# Altium PCB AthetiTech_PCB_V1.0.PcbDoc (part 2 of 3)
Units mm, origin at the board's own origin, x right, y up, seen from the top; angles counter-clockwise.
Board outline 50 x 35 mm, 2 copper layers (Top Layer, Bottom Layer); 161 components, 122 nets, 602 pads, 2 vias.
Unrouted connection lines stored in the file: 390.
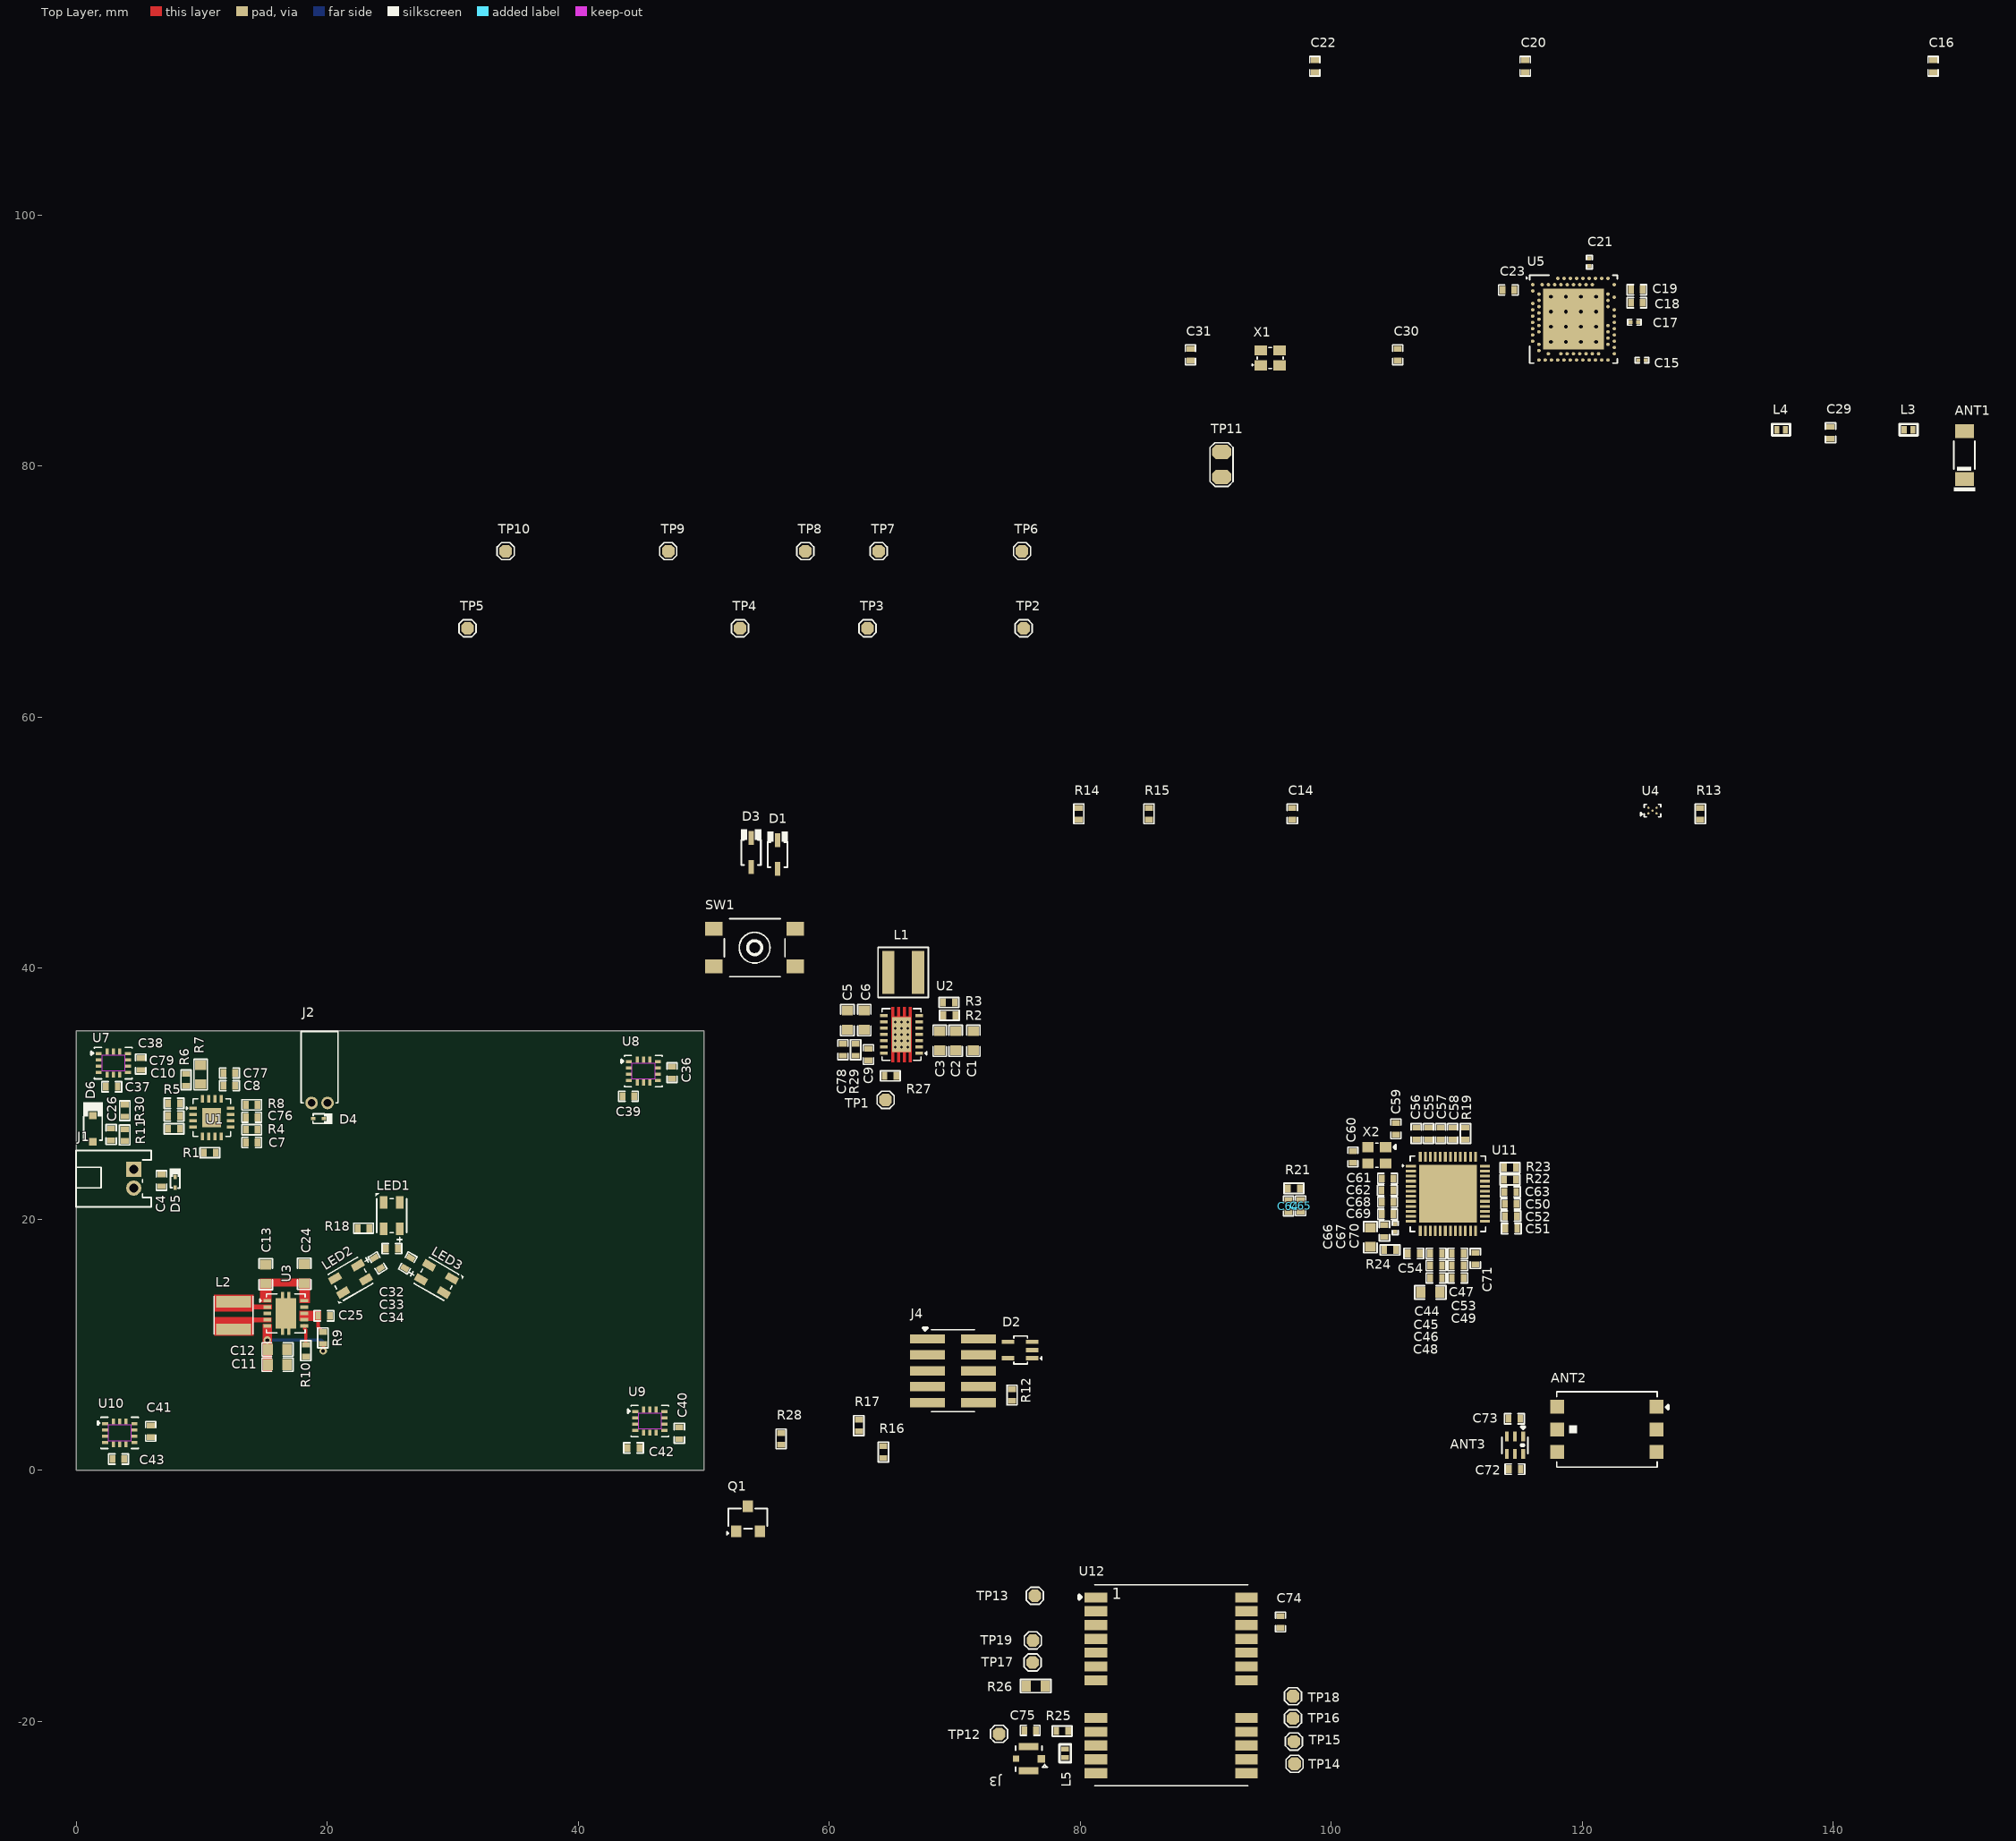
[diagram p0: Top Layer view]

## Part data (continued)
C54: library part GCM155R71H103JA55D, "CAP CER 10000PF 50V X7R 0402", Case Code (Imperial)=0402, Case Code (Metric)=1005, LCSC Part Number=C5189696, Manufacturer=Murata, Max Operating Temperature=125°C, Min Operating Temperature=-55°C, Ratings=AEC-Q200, Supplier Part Number=490-14352-2-ND, Tolerance=5%, Voltage Rating=50V, Case/Package=0402, Category="Ceramic Capacitors", ComponentLink1Description=http://search.murata.co.jp/Ceramy/image/img/A01X/partnumbering_e_02.pdf?src-supplier=Digikey, ComponentLink1URL=http://search.murata.co.jp/Ceramy/image/img/A01X/partnumbering_e_02.pdf?src-supplier=Digikey, ComponentLink2Description=http://search.murata.co.jp/Ceramy/image/img/A01X/G101/ENG/GCM155R71H103JA55-01.pdf?src-supplier=Digikey, ComponentLink2URL=http://search.murata.co.jp/Ceramy/image/img/A01X/G101/ENG/GCM155R71H103JA55-01.pdf?src-supplier=Digikey, Item Type=Capacitor, Manufacturer Part Number=GCM155R71H103JA55D, Mounting Technology="Surface Mount", Packaging="Cut Tape", RoHS=Yes, RoHS Compliant=Yes, Series=GCM, Supplier=Digikey
C64: library part 0402N270J250CT, "CAP CER 27PF 25V C0G/NP0 0402", LCSC Part Number=C424826, Manufacturer="Walsin Technologies", Supplier Part Number 1=1292-1291-1-ND, ComponentLink1Description=LCSC, ComponentLink1URL=https://lcsc.com/product-detail/Multilayer-Ceramic-Capacitors-MLCC-SMD-SMT_Walsin-Tech-Corp-0402N270J250CT_C424826.html, Item Type=Capacitor, Manufacturer Part Number=0402N270J250CT, Pricing 1="1=0.1, 10=0.017, 50=0.0094, 100=0.0076, 500=0.00544, 1000=0.00427, 2500=0.00388, 5000=0.00357 (USD)", RoHS Compliant=Yes, Stock 1=71180, Supplier 1=Digi-Key
C66: library part CC0603JRNPO9BN821, "CAP CER 820PF 50V C0G/NPO 0603", Case Code (Imperial)=0603, Case Code (Metric)=1608, Dielectric=C0G, LCSC Part Number=C107057, Manufacturer=Yageo, Max Operating Temperature=125°C, Min Operating Temperature=-55°C, Tolerance=5%, Voltage Rating=50V, Case/Package=0603, ComponentLink1Description=https://datasheet.ciiva.com/26829/getdatasheetpartid-403541-26829388.pdf?src-supplier=Verical, ComponentLink1URL=https://datasheet.ciiva.com/26829/getdatasheetpartid-403541-26829388.pdf?src-supplier=Verical, Depth=0.8mm, Height=0.8mm, Item Type=Capacitors, Lead Free="Lead Free", Length=1.6mm, Manufacturer Part Number=CC0603JRNPO9BN821, Mounting Technology="Surface Mount", Packaging="Tape and Reel", Pins=2, Pricing="4000=0.0129, 24000=0.0087, 48000=0.0086 (USD)", Radiation Hardening=No, RoHS=Yes, RoHS Compliant=Yes, Series=CC, Stock=772000, Supplier="Arrow Electronics", Termination=SMD/SMT, Thickness=0.035inch, Voltage Rating (DC)=50V, Width=0.031inch
C70: library part GJM0335C1E180GB01D, "CAP CER 18PF 25V C0G/NP0 0201", LCSC Part Number=C913481, Manufacturer="Murata Electronics", Package=0201, Supplier Part Number=1853317, Category="Ceramic Capacitors", ComponentLink1Description=LCSC, ComponentLink2Description=http://www.mouser.com/ds/2/281/c02e-2905.pdf?src-supplier=Mouser, ComponentLink2URL=http://www.mouser.com/ds/2/281/c02e-2905.pdf?src-supplier=Mouser, ComponentLink3Description=https://datasheet.octopart.com/GJM0335C1E180GB01D-Murata-datasheet-22122223.pdf?src-supplier=Future+Electronics, ComponentLink3URL=https://datasheet.octopart.com/GJM0335C1E180GB01D-Murata-datasheet-22122223.pdf?src-supplier=Future+Electronics, ComponentLink4Description=https://search.murata.co.jp/Ceramy/image/img/A01X/G101/ENG/GJM0335C1E180GB01-01.pdf?src-supplier=Digi-Key, ComponentLink4URL=https://search.murata.co.jp/Ceramy/image/img/A01X/G101/ENG/GJM0335C1E180GB01-01.pdf?src-supplier=Digi-Key, ComponentLink5Description=http://search.murata.co.jp/Ceramy/image/img/A01X/G101/ENG/GJM0335C1E180GB01-01.pdf?src-supplier=Digi-Key, ComponentLink5URL=http://search.murata.co.jp/Ceramy/image/img/A01X/G101/ENG/GJM0335C1E180GB01-01.pdf?src-supplier=Digi-Key, ComponentLink6Description=https://datasheet.octopart.com/GJM0335C1E180GB01D-Murata-datasheet-12511495.pdf?src-supplier=TME, ComponentLink6URL=https://datasheet.octopart.com/GJM0335C1E180GB01D-Murata-datasheet-12511495.pdf?src-supplier=TME, Item Type=Capacitor, Manufacturer Part Number=GJM0335C1E180GB01D, Pricing="1000=0.018, 5000=0.015, 10000=0.012 (GBP)", RoHS=Yes, Stock=15000, Supplier=Rs
D1 D3: "Diode Schottky Barrier 25V 0.3A 2 SOD-323", Average Rectified Current=300mA, Case/Package=SOD, LCSC Part Number=C146358, Manufacturer=Toshiba, Max Operating Temperature=100°C, Max Repetitive Reverse Voltage (Vrrm)=25V, Max Reverse Voltage (DC)=20V, Min Operating Temperature=-40°C, Category="Rectifier Diodes", ComponentLink1Description=https://datasheet.ciiva.com/45259/dst-1ss404-tde-en-1850-45259189.pdf?src-supplier=Digikey, ComponentLink1URL=https://datasheet.ciiva.com/45259/dst-1ss404-tde-en-1850-45259189.pdf?src-supplier=Digikey, ComponentLink2Description=https://datasheet.ciiva.com/45259/dst-1ss404-tde-en-1850-45259190.pdf?src-supplier=Digikey, ComponentLink2URL=https://datasheet.ciiva.com/45259/dst-1ss404-tde-en-1850-45259190.pdf?src-supplier=Digikey, ComponentLink3Description=https://datasheet.ciiva.com/45259/dst-1ss404-tde-en-1850-45259191.pdf?src-supplier=Digikey, ComponentLink3URL=https://datasheet.ciiva.com/45259/dst-1ss404-tde-en-1850-45259191.pdf?src-supplier=Digikey, Contact Plating=Tin,Silver, Forward Current=300mA, Item Type=Diode, Manufacturer Part Number=1SS404,H3F, Mount="Surface Mount", Packaging="Cut Tape", Pricing 1="3000=0.01778, 6000=0.01748, 12000=0.01718, 18000=0.01688, 24000=0.01658 (USD)", RoHS=No, Series=-, Stock 1=36000, Supplier 1=Avnet, Supplier Part Number 1=1SS404,H3F
D2: "TVS DIODE 3VWM SOT323-5", LCSC Part Number=C703691, Manufacturer=STMicroelectronics, ComponentLink1Description=https://datasheet.ciiva.com/23847/cd00002946-23847220.pdf?src-supplier=Newark, ComponentLink1URL=https://datasheet.ciiva.com/23847/cd00002946-23847220.pdf?src-supplier=Newark, ComponentLink2Description=https://datasheet.ciiva.com/4509/cd00002946-81943-4509940.pdf?src-supplier=Mouser, ComponentLink2URL=https://datasheet.ciiva.com/4509/cd00002946-81943-4509940.pdf?src-supplier=Mouser, ComponentLink3Description=https://datasheet.ciiva.com/5782/cd00002946-5782886.pdf?src-supplier=Farnell, ComponentLink3URL=https://datasheet.ciiva.com/5782/cd00002946-5782886.pdf?src-supplier=Farnell, ComponentLink4Description=https://datasheet.ciiva.com/338/cd00002946-338376.pdf?src-supplier=Digikey, ComponentLink4URL=https://datasheet.ciiva.com/338/cd00002946-338376.pdf?src-supplier=Digikey, ComponentLink5Description=https://datasheet.ciiva.com/338/cd00002946-338377.pdf?src-supplier=Digikey, ComponentLink5URL=https://datasheet.ciiva.com/338/cd00002946-338377.pdf?src-supplier=Digikey, ComponentLink6Description=https://datasheet.ciiva.com/338/cd00002946-338378.pdf?src-supplier=Digikey, ComponentLink6URL=https://datasheet.ciiva.com/338/cd00002946-338378.pdf?src-supplier=Digikey, Item Type="TVS Diodes", Manufacturer Part Number=ESDALC6V1W5, Pricing="3000=0.0569, 9000=0.0547, 12000=0.0774, 15000=0.0538, 30000=0.0749, 45000=0.0518, 75000=0.05 (USD)", RoHS=Yes, Stock=3000, Supplier="Future Electronics"
D4 D5: "TVS DIODE 5V 9.8V SOD923", Breakdown Voltage=5.4V, Capacitance=0.9pF, Case/Package=SOD-923-2, Clamping Voltage=9.8V, LCSC Part Number=C82326, Leakage Current=1uA, Manufacturer="ON Semiconductor", Max Operating Temperature=150°C, Max Surge Current=1A, Min Operating Temperature=-55°C, Operating Supply Voltage=5V, Package Quantity=1, Peak Pulse Power=150mW, Power Line Protection=No, Resistor Type=Zener, Reverse Breakdown Voltage=5.8V, Supplier Part Number 1=ESD9L5.0ST5GOSCT-ND, Test Current=1mA, Category="ESD and Circuit Protection ICs", Clamping Voltage-Max=9.8V, ComponentLink1Description=https://datasheet.ciiva.com/15143/getdatasheetpartid-185186-15143896.pdf?src-supplier=Verical, ComponentLink1URL=https://datasheet.ciiva.com/15143/getdatasheetpartid-185186-15143896.pdf?src-supplier=Verical, ComponentLink2Description=https://datasheet.ciiva.com/4510/esd9l-d-4510647.pdf?src-supplier=Mouser, ComponentLink2URL=https://datasheet.ciiva.com/4510/esd9l-d-4510647.pdf?src-supplier=Mouser, ComponentLink3Description=https://datasheet.ciiva.com/3304/esd9l-d-3304011.pdf?src-supplier=Avnet, ComponentLink3URL=https://datasheet.ciiva.com/3304/esd9l-d-3304011.pdf?src-supplier=Avnet, ComponentLink4Description=https://datasheet.ciiva.com/16437/esd9l-d-16437835.pdf?src-supplier=Future+Electronics, ComponentLink4URL=https://datasheet.ciiva.com/16437/esd9l-d-16437835.pdf?src-supplier=Future+Electronics, ComponentLink5Description=https://datasheet.ciiva.com/339/esd9l-d-339853.pdf?src-supplier=Digi-Key, ComponentLink5URL=https://datasheet.ciiva.com/339/esd9l-d-339853.pdf?src-supplier=Digi-Key, ComponentLink6Description=https://datasheet.ciiva.com/339/esd9l-d-339854.pdf?src-supplier=Digi-Key, ComponentLink6URL=https://datasheet.ciiva.com/339/esd9l-d-339854.pdf?src-supplier=Digi-Key, ComponentLink7Description=https://datasheet.ciiva.com/11195/esd9l-d-11195342.pdf?src-supplier=Avnet, ComponentLink7URL=https://datasheet.ciiva.com/11195/esd9l-d-11195342.pdf?src-supplier=Avnet, ComponentLink8Description=https://datasheet.ciiva.com/25958/esd9l-d-25958446.pdf?src-supplier=Avnet+Europe, ComponentLink8URL=https://datasheet.ciiva.com/25958/esd9l-d-25958446.pdf?src-supplier=Avnet+Europe, ComponentLink9Description=https://datasheet.ciiva.com/339/esd9l-d-339855.pdf?src-supplier=Digi-Key, ComponentLink9URL=https://datasheet.ciiva.com/339/esd9l-d-339855.pdf?src-supplier=Digi-Key, Contact Plating=Tin,Matte, Depth=0.6mm, Diode Type=ZENER, Direction=Unidirectional, Element Configuration=Single, ESD Protection=Yes, Halogen Free="Halogen Free", Height=0.4mm, Lead Free="Lead Free", Length=0.8mm, Manufacturer Part Number=ESD9L5.0ST5G, Max Breakdown Voltage=5.4V, Max Reverse Leakage Current=1uA, Min Breakdown Voltage=5.4V, Number of Channels=1, Number of Elements=1, Number of Lines=1, Number of Pins=2, Number of Unidirectional Channels=1, Packaging="Tape and Reel", Peak Pulse Current=1A, Polarity=Unidirectional, Power Dissipation=150mW, Pricing 1="1=0.37000, 10=0.25600, 100=0.12500, 500=0.10426, 1000=0.07244, 2000=0.06278 (USD)", Radiation Hardening=No, REACH SVHC="No SVHC", Reverse Standoff Voltage=5V, RoHS=Yes, RoHS Compliant=Yes, Series="Automotive, AEC-Q101", Stock 1=558996, Supplier 1=Digi-Key, Termination=SMD/SMT, Width=0.65mm, Working Voltage=5V
D6: "DIODE ZENER 3.3V 200MW SOD323F", Forward Voltage=1V, LCSC Part Number=C2978865, Manufacturer="ON Semiconductor / Fairchild", Max Operating Temperature=150°C, Max Power Dissipation=200mW, Max Reverse Leakage Current=4.5uA, Min Operating Temperature=-65°C, Package Quantity=1, Supplier Part Number 1=MM3Z3V3BCT-ND, Test Current=5mA, Tolerance=2%, Working Voltage=3.3V, ComponentLink1Description=http://www.onsemi.com/pub/Collateral/MM3Z9V1B-D.pdf?src-supplier=Digi-Key, ComponentLink1URL=http://www.onsemi.com/pub/Collateral/MM3Z9V1B-D.pdf?src-supplier=Digi-Key, ComponentLink2Description=http://www.mouser.com/ds/2/149/MM3Z3V3B-187166.pdf?src-supplier=Mouser, ComponentLink2URL=http://www.mouser.com/ds/2/149/MM3Z3V3B-187166.pdf?src-supplier=Mouser, ComponentLink3Description=https://www.fairchildsemi.com/datasheets/MM/MM3Z9V1B.pdf?src-supplier=Avnet, ComponentLink3URL=https://www.fairchildsemi.com/datasheets/MM/MM3Z9V1B.pdf?src-supplier=Avnet, ComponentLink4Description=http://www.farnell.com/datasheets/1706525.pdf?src-supplier=Element14, ComponentLink4URL=http://www.farnell.com/datasheets/1706525.pdf?src-supplier=Element14, Element Configuration=Single, Height=1mm, Impedance=89R, Item Type=Diode, Lead Free="Lead Free", Length=1.3mm, Manufacturer Part Number=MM3Z3V3B, Mount="Surface Mount", Number of Pins=2, Packaging="Tape and Reel", Peak Reverse Current=4.5uA, Power Dissipation=200mW, Pricing 1="1=0.22, 10=0.18, 100=0.0956, 500=0.06288, 1000=0.04276 (USD)", Radiation Hardening=No, REACH SVHC="No SVHC", Stock 1=473644, Supplier 1=Digi-Key, Voltage Tolerance=2%, Weight=0.0276g, Width=1.7mm, Zener Voltage=3.3V
J1: "CONN HEADER R/A 2POS 1.5MM", LCSC Part Number=C160729, Manufacturer=JST, Item Type=Connectors, Manufacturer Part Number=S2B-ZR-3.4(LF)(SN), Pricing="2000=0.0671, 4000=0.0659, 8000=0.0648, 10000=0.0645, 30000=0.0623 (USD)", RoHS=Yes, Supplier="Future Electronics"
J2: "2 Position Spring Piston Connector Through Hole, Right Angle", Manufacturer=Mill-Max, Supplier Part Number=54-854-22-002-20-041101-ND, Item Type="Spring Loaded", Manufacturer Part Number=854-22-002-20-041101, Pricing="1=3.53, 10=3.002, 25=2.8136, 50=2.679, 100=2.551, 250=2.39124, 500=2.27716, 1000=2.16851, 2500=2.03287 (USD)", RoHS=No, Supplier=Digikey
J3: "CONN MHF4 JACK STR SMD", Manufacturer="TE Connectivity", Supplier Part Number=712-CONMHF4-SMD-G-T, Item Type=Connectors, Manufacturer Part Number=CONMHF4-SMD-G-T, Number of Positions=1, Pricing="1=0.35, 10=0.35, 50=0.35, 100=0.345, 1000=0.26, 10000=0.26 (USD)", RoHS=No, Stock=14009, Supplier=Mouser
J4: "CONN HEADER SMD 10POS 1.27MM SWD Connector", LCSC Part Number=C448647, Manufacturer=Samtec, ComponentLink1Description=https://datasheet.ciiva.com/23735/81359-23735917.pdf?src-supplier=Newark, ComponentLink1URL=https://datasheet.ciiva.com/23735/81359-23735917.pdf?src-supplier=Newark, ComponentLink2Description=https://datasheet.ciiva.com/10245/ftsh-mt-10245289.pdf?src-supplier=Avnet, ComponentLink2URL=https://datasheet.ciiva.com/10245/ftsh-mt-10245289.pdf?src-supplier=Avnet, ComponentLink3Description=https://datasheet.ciiva.com/739/ftsh-1xx-xx-xxx-dv-xxx-mkt-739005.pdf?src-supplier=Digikey, ComponentLink3URL=https://datasheet.ciiva.com/739/ftsh-1xx-xx-xxx-dv-xxx-mkt-739005.pdf?src-supplier=Digikey, Item Type=Header, Manufacturer Part Number=FTSH-105-01-L-DV-K-TR, Pricing="1=2.58, 100=2.03, 250=1.83 (USD)", RoHS=Yes, Stock=9031, Supplier=Digikey
L1: library part XFL4020-152MEC, "FIXED IND 1.5UH 9.1A 15.8MOHM SM", LCSC Part Number=C3033018, Manufacturer=Coilcraft, ComponentLink1Description=https://datasheet.ciiva.com/13168/xfl4020-13168080.pdf?src-supplier=Mouser, ComponentLink1URL=https://datasheet.ciiva.com/13168/xfl4020-13168080.pdf?src-supplier=Mouser, ComponentLink2Description=https://datasheet.ciiva.com/22679/1682010-22679275.pdf?src-supplier=Element14, ComponentLink2URL=https://datasheet.ciiva.com/22679/1682010-22679275.pdf?src-supplier=Element14, ComponentLink3Description=https://datasheet.ciiva.com/22679/1682010-22679276.pdf?src-supplier=Element14, ComponentLink3URL=https://datasheet.ciiva.com/22679/1682010-22679276.pdf?src-supplier=Element14, ESR=15.8mR, Item Type=Inductors, Manufacturer Part Number=XFL4020-152MEC, Pricing="1=3.04, 10=2.59, 50=2.39, 100=1.78, 1000=1.23, 10000=1.23 (USD)", RoHS=Yes, Stock=9871, Supplier=Mouser
L2: library part LQH3NPN2R2MJRL, "FIXED IND 2.2UH 980MA 81.6 MOHM", Case Code (Imperial)=1212, Case Code (Metric)=3030, Current Rating=980mA, DC Resistance (DCR)=81.6mR, LCSC Part Number=C341775, Manufacturer=Murata, Max Operating Temperature=105°C, Min Operating Temperature=-40°C, Resistor Type=Wirewound, Saturation Current=1.8A, Self Resonant Frequency=45MHz, Test Frequency=1MHz, Tolerance=20%, Case/Package=1212, Category="Fixed Inductors", ComponentLink1Description=http://www.murata.com/~/media/webrenewal/support/library/catalog/products/inductor/chip/o05e.ashx?src-supplier=Digi-Key, ComponentLink1URL=http://www.murata.com/~/media/webrenewal/support/library/catalog/products/inductor/chip/o05e.ashx?src-supplier=Digi-Key, ComponentLink2Description=http://search.murata.co.jp/Ceramy/image/img/P02/JELF243A-0114.pdf?src-supplier=Digi-Key, ComponentLink2URL=http://search.murata.co.jp/Ceramy/image/img/P02/JELF243A-0114.pdf?src-supplier=Digi-Key, Core Material=Ferrite, Height - Seated (Max)=0.047inch, Item Type=Inductor, Length=0.118inch, Manufacturer Part Number=LQH3NPN2R2MJRL, Mounting Technology="Surface Mount", Packaging="Tape and Reel", Pricing 1="1=0.41670, 10=0.27560, 25=0.27280, 100=0.23380, 250=0.22710, 500=0.21570, 1000=0.17630 (USD)", RoHS=Yes, RoHS Compliant=Yes, Shielding=Shielded, Stock 1=1497, Supplier 1="Arrow Electronics", Supplier Part Number 1=LQH3NPN2R2MJRL, Width=0.118inch
L3: library part LRC0402CS3N3GV001T, "Fixed Ind 3.3NH 300MA 190MOHM Sm", Manufacturer=Johanson, Supplier Part Number=712-LRC0402CS3N3GV001TCT-ND, Item Type=Inductors, Manufacturer Part Number=LRC0402CS3N3GV001T, Pricing="1=0.1, 10=0.03, 100=0.0247, 1000=0.02034, 5000=0.01774 (USD)", RoHS=Yes, RoHS Compliant=Yes, Stock=663707, Supplier=Digikey
L4: library part CS0402-2N7J-S, "640mA 2.7nH ±5% 120mΩ 0402 Inductors (SMD) ROHS", LCSC Part Number=C142181, Manufacturer="Chilisin Elec", Package=0402, ComponentLink1Description=LCSC, ComponentLink1URL=https://www.lcsc.com/product-detail/Inductors-SMD_Chilisin-Elec-CS0402-2N7J-S_C142181.html, Item Type=Inductors, Manufacturer Part Number=CS0402-2N7J-S
L5: library part LQG15HZ27NH02D, "FIXED IND 27NH 350MA 460MOHM SMD", Case Code (Imperial)=0402, Case Code (Metric)=1005, Current Rating=350mA, DC Resistance (DCR)=460mR, LCSC Part Number=C237452, Manufacturer=Murata, Max Operating Temperature=125°C, Min Operating Temperature=-55°C, Ratings=AEC-Q200, Self Resonant Frequency=1.7GHz, Supplier Part Number=81-LQG15HZ27NH02D, Test Frequency=100MHz, Tolerance=3%, Case/Package=0402, Category="Fixed Inductors", ComponentLink1Description=http://search.murata.co.jp/Ceramy/image/img/P02/JELF243B-9110.pdf?src-supplier=Digi-Key, ComponentLink1URL=http://search.murata.co.jp/Ceramy/image/img/P02/JELF243B-9110.pdf?src-supplier=Digi-Key, Core Material=Air, Item Type=Inductor, Manufacturer Part Number=LQG15HZ27NH02D, Mounting Technology="Surface Mount", Packaging="Cut Tape", Pricing="1=0.1, 10=0.068, 50=0.068, 100=0.047, 1000=0.03, 10000=0.026 (USD)", RoHS=Yes, RoHS Compliant=Yes, Series=LQG15, Shielding=Unshielded, Stock=436, Supplier=Mouser
LED1 LED2 LED3: "SMD,2.4x2.7mm RGB LEDs(Built-in IC) ROHS", LCSC Part Number=C4154872, Manufacturer=WORLDSEMI, Item Type=LED, Manufacturer Part Number=WS2812C-2427, RoHS=No, Supplier=LCSC
Q1: "N-CHANNEL 20-V (D-S) MOSFET", LCSC Part Number=C5310968, Manufacturer="TECH PUBLIC", Manufacturer Part Number=SI2302CDS, Package=SOT-23, ComponentLink1Description=LCSC, ComponentLink1URL=https://www.lcsc.com/product-detail/MOSFETs_TECH-PUBLIC-SI2302CDS_C5310968.html, Item Type=Mosfet
R1 R4 R19 R30: library part RC0402FR-07100KL, "RES 100K OHM 1% 1/16W 0402", Case Code (Imperial)=0402, Case Code (Metric)=1005, LCSC Part Number=C60491, Manufacturer=Yageo, Max Operating Temperature=155°C, Max Power Dissipation=63mW, Min Operating Temperature=-55°C, Package Quantity=1, Resistance=100kR, Resistance Tolerance=1%, Resistor Type="Thick Film", Supplier Part Number 1=603-RC0402FR-07100KL, Temperature Coefficient=100ppm/°C, Voltage Rating=50V, Case/Package=0402, Category="Chip SMD Resistors", ComponentLink1Description=https://datasheet.ciiva.com/11819/0900766b80c66297-11819452.pdf?src-supplier=RSComponents, ComponentLink1URL=https://datasheet.ciiva.com/11819/0900766b80c66297-11819452.pdf?src-supplier=RSComponents, ComponentLink2Description=https://datasheet.ciiva.com/22747/1018594-22747509.pdf?src-supplier=Element14, ComponentLink2URL=https://datasheet.ciiva.com/22747/1018594-22747509.pdf?src-supplier=Element14, ComponentLink3Description=https://datasheet.ciiva.com/2453/pyu-r-int-thick-7-2453362.pdf?src-supplier=Digi-Key, ComponentLink3URL=https://datasheet.ciiva.com/2453/pyu-r-int-thick-7-2453362.pdf?src-supplier=Digi-Key, ComponentLink4Description=https://datasheet.ciiva.com/2453/pyu-r-int-thick-7-2453363.pdf?src-supplier=Digi-Key, ComponentLink4URL=https://datasheet.ciiva.com/2453/pyu-r-int-thick-7-2453363.pdf?src-supplier=Digi-Key, ComponentLink5Description=https://datasheet.ciiva.com/2453/pyu-r-int-thick-7-2453361.pdf?src-supplier=Digi-Key, ComponentLink5URL=https://datasheet.ciiva.com/2453/pyu-r-int-thick-7-2453361.pdf?src-supplier=Digi-Key, ComponentLink6Description=https://datasheet.ciiva.com/12667/pyu-rc0402-51-rohs-l-6-r-12667930.pdf?src-supplier=Mouser, ComponentLink6URL=https://datasheet.ciiva.com/12667/pyu-rc0402-51-rohs-l-6-r-12667930.pdf?src-supplier=Mouser, ComponentLink7Description=https://datasheet.ciiva.com/15189/getdatasheetpartid-323696-15189334.pdf?src-supplier=Verical, ComponentLink7URL=https://datasheet.ciiva.com/15189/getdatasheetpartid-323696-15189334.pdf?src-supplier=Verical, Construction=Rectangular, Depth=0.5mm, Features="Moisture Resistant", Height=0.016inch, Item Type=Resistor, Lead Free="Lead Free", Length=0.039inch, Manufacturer Part Number=RC0402FR-07100KL, Military Standard=Not, Number of Terminations=2, Packaging="Tape and Reel", Power Rating=63mW, Pricing 1="1=0.10000, 10=0.01200, 50=0.01200, 100=0.00500, 1000=0.00300, 2500=0.00200, 10000=0.00100 (USD)", REACH SVHC="No SVHC", RoHS=Yes, RoHS Compliant=Yes, Series=RC, Stock 1=7759549, Supplier 1=Mouser, Technology="THICK FILM", Termination=SMD/SMT, Tolerance=1%, Width=0.02inch, Working Voltage=50V
R2 R27: library part AF0402JR-071ML, "RES SMD 1M OHM 5% 1/16W 0402", Case/Package=0402, LCSC Part Number=C144054, Manufacturer=Yageo, Max Operating Temperature=155°C, Max Power Dissipation=63mW, Min Operating Temperature=-55°C, Resistance=1MR, Resistor Type="Thick Film", Supplier Part Number 1=AF0402JR-071ML-ND, Temperature Coefficient=100ppm/°C, Tolerance=5%, ComponentLink1Description=https://www.yageo.com/upload/media/product/productsearch/datasheet/rchip/PYu-AF_51_RoHS_L_6.pdf?src-supplier=Digi-Key, ComponentLink1URL=https://www.yageo.com/upload/media/product/productsearch/datasheet/rchip/PYu-AF_51_RoHS_L_6.pdf?src-supplier=Digi-Key, Features="Moisture Resistant,Anti-Sulfur", Height=0.015inch, Item Type=Resistor, Length=0.039inch, Manufacturer Part Number=AF0402JR-071ML, Number of Terminations=2, Packaging="Tape and Reel", Pricing 1="10000=0.00408 (USD)", RoHS Compliant=Yes, Stock 1=0, Supplier 1=Digi-Key, Width=0.02inch
R3: library part RT0402BRD07180KL, "RES 180K OHM 0.1% 1/16W 0402", Case/Package=0402, LCSC Part Number=C852573, Manufacturer=Yageo, Max Operating Temperature=155°C, Max Power Dissipation=63mW, Min Operating Temperature=-55°C, Supplier Part Number=603-RT0402BRD07180KL, Temperature Coefficient=25ppm/°C, Tolerance=0.1%, Category="Chip SMD Resistors", ComponentLink1Description=http://www.yageo.com/documents/recent/PYu-RT_1-to-0.01_RoHS_L_9.pdf?src-supplier=Digi-Key, ComponentLink1URL=http://www.yageo.com/documents/recent/PYu-RT_1-to-0.01_RoHS_L_9.pdf?src-supplier=Digi-Key, Item Type=Resistor, Manufacturer Part Number=RT0402BRD07180KL, Number of Terminations=2, Packaging="Tape and Reel", Pricing="1=0.44, 10=0.324, 50=0.324, 100=0.129, 1000=0.064, 10000=0.051 (USD)", RoHS=Yes, RoHS Compliant=Yes, Series=RT, Stock=23360, Supplier=Mouser
R5 R6 R10 R16 R17 R22 R23 R29: library part RC0402FR-0710KL, "RES 10K OHM 1% 1/16W 0402", Case Code (Imperial)=0402, Case Code (Metric)=1005, LCSC Part Number=C60490, Manufacturer=Yageo, Max Operating Temperature=155°C, Max Power Dissipation=63mW, Min Operating Temperature=-55°C, Power Rating=62.5mW, Resistance=10kR, Resistance Tolerance=1%, Resistor Type="Thick Film", Supplier Part Number 1=603-RC0402FR-0710KL, Temperature Coefficient=100ppm/°C, Voltage Rating=50V, Case/Package=0402, Category="Chip SMD Resistors", ComponentLink1Description=https://datasheet.ciiva.com/7660/38568-7660787.pdf?src-supplier=Element14, ComponentLink1URL=https://datasheet.ciiva.com/7660/38568-7660787.pdf?src-supplier=Element14, ComponentLink2Description=https://datasheet.ciiva.com/7849/1686128-7849814.pdf?src-supplier=Element14, ComponentLink2URL=https://datasheet.ciiva.com/7849/1686128-7849814.pdf?src-supplier=Element14, ComponentLink3Description=https://datasheet.ciiva.com/7983/1018594-7983486.pdf?src-supplier=Element14, ComponentLink3URL=https://datasheet.ciiva.com/7983/1018594-7983486.pdf?src-supplier=Element14, ComponentLink4Description=https://datasheet.ciiva.com/22747/1018594-22747512.pdf?src-supplier=Element14, ComponentLink4URL=https://datasheet.ciiva.com/22747/1018594-22747512.pdf?src-supplier=Element14, ComponentLink5Description=https://datasheet.ciiva.com/12667/pyu-rc0402-51-rohs-l-6-r-12667067.pdf?src-supplier=Mouser, ComponentLink5URL=https://datasheet.ciiva.com/12667/pyu-rc0402-51-rohs-l-6-r-12667067.pdf?src-supplier=Mouser, ComponentLink6Description=https://datasheet.ciiva.com/7849/1784430-7849813.pdf?src-supplier=Element14, ComponentLink6URL=https://datasheet.ciiva.com/7849/1784430-7849813.pdf?src-supplier=Element14, ComponentLink7Description=https://datasheet.ciiva.com/7849/1784430-7849815.pdf?src-supplier=Element14, ComponentLink7URL=https://datasheet.ciiva.com/7849/1784430-7849815.pdf?src-supplier=Element14, Construction=Rectangular, Depth=0.5mm, Features="Moisture Resistant", Height=0.32mm, Item Type=Resistor, Lead Free="Lead Free", Lead Pitch=0.2mm, Length=1mm, Manufacturer Part Number=RC0402FR-0710KL, Military Standard=Not, Number of Pins=2, Number of Terminations=2, Packaging="Tape and Reel", Pricing 1="1=0.10000, 10=0.01400, 50=0.01400, 100=0.00500, 1000=0.00300, 10000=0.00200 (USD)", REACH SVHC="No SVHC", RoHS=Yes, RoHS Compliant=Yes, Series=RC, Stock 1=18648329, Supplier 1=Mouser, Termination=SMD/SMT, Tolerance=1%, Voltage Rating (DC)=50V, Width=0.5mm, Working Voltage=50V
R7: library part AR03BTCX1131, "Thin Film Resistor ±25ppm/℃ ±0.1% 1.13kΩ 0603 Chip Resistor - Surface Mount ROHS", LCSC Part Number=C2984318, Manufacturer="Viking Tech", Package=0603, ComponentLink1Description=LCSC, ComponentLink1URL=https://www.lcsc.com/product-detail/Chip-Resistor-Surface-Mount_Viking-Tech-AR03BTCX1131_C2984318.html, Item Type=Resistor, Manufacturer Part Number=AR03BTCX1131
R8: library part RT0402BRD071K18L, "RES SMD 1.18KOHM 0.1% 1/16W 0402", LCSC Part Number=C852601, Manufacturer=Yageo, ComponentLink1Description=https://datasheet.ciiva.com/2582/pyu-rt-1-to-0-05-rohs-l-4-2582193.pdf?src-supplier=Digikey, ComponentLink1URL=https://datasheet.ciiva.com/2582/pyu-rt-1-to-0-05-rohs-l-4-2582193.pdf?src-supplier=Digikey, ComponentLink2Description=https://datasheet.ciiva.com/46635/pyu-rt-1-to-0-05-rohs-l-5-46635161.pdf?src-supplier=Digikey, ComponentLink2URL=https://datasheet.ciiva.com/46635/pyu-rt-1-to-0-05-rohs-l-5-46635161.pdf?src-supplier=Digikey, Item Type=Resistors, Manufacturer Part Number=RT0402BRD071K18L, Pricing="10000=0.01384 (USD)", RoHS=Yes, Stock=10000, Supplier=Avnet
R9: library part RC0402FR-07100RL, "RES 100 OHM 1% 1/16W 0402", Case Code (Imperial)=0402, Case Code (Metric)=1005, LCSC Part Number=C106232, Manufacturer=Yageo, Max Operating Temperature=155°C, Max Power Dissipation=63mW, Min Operating Temperature=-55°C, Power Rating=62.5mW, Resistance Tolerance=1%, Resistor Type="Thick Film", Supplier Part Number 1=603-RC0402FR-07100RL, Temperature Coefficient=100ppm/°C, Voltage Rating=50V, Case/Package=0402, Category="Chip SMD Resistors", ComponentLink1Description=https://datasheet.ciiva.com/11808/0900766b80c66297-11808765.pdf?src-supplier=RSComponents, ComponentLink1URL=https://datasheet.ciiva.com/11808/0900766b80c66297-11808765.pdf?src-supplier=RSComponents, ComponentLink2Description=https://datasheet.ciiva.com/7849/1784430-7849810.pdf?src-supplier=Element14, ComponentLink2URL=https://datasheet.ciiva.com/7849/1784430-7849810.pdf?src-supplier=Element14, ComponentLink3Description=https://datasheet.ciiva.com/28367/1018594-28367226.pdf?src-supplier=Element14, ComponentLink3URL=https://datasheet.ciiva.com/28367/1018594-28367226.pdf?src-supplier=Element14, ComponentLink4Description=https://datasheet.ciiva.com/22747/1018594-22747511.pdf?src-supplier=Element14, ComponentLink4URL=https://datasheet.ciiva.com/22747/1018594-22747511.pdf?src-supplier=Element14, ComponentLink5Description=https://datasheet.ciiva.com/12667/pyu-rc0402-51-rohs-l-6-r-12667957.pdf?src-supplier=Mouser, ComponentLink5URL=https://datasheet.ciiva.com/12667/pyu-rc0402-51-rohs-l-6-r-12667957.pdf?src-supplier=Mouser, ComponentLink6Description=https://datasheet.ciiva.com/15189/getdatasheetpartid-329466-15189335.pdf?src-supplier=Verical, ComponentLink6URL=https://datasheet.ciiva.com/15189/getdatasheetpartid-329466-15189335.pdf?src-supplier=Verical, ComponentLink7Description=https://datasheet.ciiva.com/16740/pyu-rc0402-51-rohs-l-6-r-16740566.pdf?src-supplier=Future+Electronics, ComponentLink7URL=https://datasheet.ciiva.com/16740/pyu-rc0402-51-rohs-l-6-r-16740566.pdf?src-supplier=Future+Electronics, Construction=Rectangular, Depth=0.5mm, Features="Moisture Resistant", Height=0.32mm, Item Type=Resistor, Lead Free="Lead Free", Length=1mm, Manufacturer Part Number=RC0402FR-07100RL, Military Standard=Not, Number of Pins=2, Number of Terminations=2, Packaging="Tape and Reel", Pricing 1="1=0.10000, 10=0.01200, 50=0.01200, 100=0.00500, 1000=0.00300, 2500=0.00200, 10000=0.00100 (USD)", REACH SVHC="No SVHC", Resistance=100R, RoHS=Yes, RoHS Compliant=Yes, Series=RC, Size Code=0402, Stock 1=699545, Supplier 1=Mouser, Technology="THICK FILM", Termination=SMD/SMT, Tolerance=1%, Voltage Rating (DC)=50V, Width=0.5mm
R11: library part RC0402FR-07200KL, "RES 200K OHM 1% 1/16W 0402", Case Code (Imperial)=0402, Case Code (Metric)=1005, LCSC Part Number=C114763, Manufacturer=Yageo, Max Operating Temperature=155°C, Max Power Dissipation=63mW, Min Operating Temperature=-55°C, Package Quantity=1, Resistance Tolerance=1%, Resistor Type="Thick Film", Temperature Coefficient=100ppm/°C, Voltage Rating=50V, Case/Package=0402, ComponentLink1Description=https://datasheet.ciiva.com/7849/1018594-7849897.pdf?src-supplier=Element14, ComponentLink1URL=https://datasheet.ciiva.com/7849/1018594-7849897.pdf?src-supplier=Element14, ComponentLink2Description=https://datasheet.ciiva.com/7849/1018594-7849896.pdf?src-supplier=Element14, ComponentLink2URL=https://datasheet.ciiva.com/7849/1018594-7849896.pdf?src-supplier=Element14, ComponentLink3Description=https://datasheet.ciiva.com/46394/1018594-46394953.pdf?src-supplier=Element14, ComponentLink3URL=https://datasheet.ciiva.com/46394/1018594-46394953.pdf?src-supplier=Element14, ComponentLink4Description=https://datasheet.ciiva.com/2453/pyu-r-int-thick-7-2453557.pdf?src-supplier=Digikey, ComponentLink4URL=https://datasheet.ciiva.com/2453/pyu-r-int-thick-7-2453557.pdf?src-supplier=Digikey, ComponentLink5Description=https://datasheet.ciiva.com/2453/pyu-r-int-thick-7-2453558.pdf?src-supplier=Digikey, ComponentLink5URL=https://datasheet.ciiva.com/2453/pyu-r-int-thick-7-2453558.pdf?src-supplier=Digikey, ComponentLink6Description=https://datasheet.ciiva.com/2453/pyu-r-int-thick-7-2453556.pdf?src-supplier=Digikey, ComponentLink6URL=https://datasheet.ciiva.com/2453/pyu-r-int-thick-7-2453556.pdf?src-supplier=Digikey, ComponentLink7Description=https://datasheet.ciiva.com/12667/pyu-rc0402-51-rohs-l-6-r-12667911.pdf?src-supplier=Mouser, ComponentLink7URL=https://datasheet.ciiva.com/12667/pyu-rc0402-51-rohs-l-6-r-12667911.pdf?src-supplier=Mouser, ComponentLink8Description=https://datasheet.ciiva.com/15189/getdatasheetpartid-323720-15189381.pdf?src-supplier=Verical, ComponentLink8URL=https://datasheet.ciiva.com/15189/getdatasheetpartid-323720-15189381.pdf?src-supplier=Verical, ComponentLink9Description=https://datasheet.ciiva.com/16740/pyu-rc0402-51-rohs-l-6-r-16740636.pdf?src-supplier=Future+Electronics, ComponentLink9URL=https://datasheet.ciiva.com/16740/pyu-rc0402-51-rohs-l-6-r-16740636.pdf?src-supplier=Future+Electronics, Construction=Rectangular, Depth=0.5mm, Features="Moisture Resistant", Height=0.016inch, Item Type=Resistor, Lead Free=5697LeadFree, Length=0.039inch, Manufacturer Part Number=RC0402FR-07200KL, Military Standard=Not, Number of Terminations=2, Packaging="Tape and Reel", Power Rating=63mW, Pricing="10000=0.0004, 50000=0.0008, 150000=0.0004, 300000=0.0007, 400000=0.0004, 1000000=0.0004, 2500000=0.0004, 3000000=0.0006 (USD)", Reach SVHC Compliant=Unknown, RoHS=Yes, RoHS Compliant=Yes, Series=RC, Stock=290000, Supplier="Future Electronics", Technology="THICK FILM", Termination=SMD/SMT, Tolerance=1%, Voltage Rating (DC)=50V, Width=0.02inch, Working Voltage=50V
R12: library part RC0402FR-070RL, "RES 0 OHM JUMPER 1/16W 0402", Case Code (Imperial)=0402, Case Code (Metric)=1005, LCSC Part Number=C106231, Manufacturer=Yageo, Max Operating Temperature=155°C, Max Power Dissipation=63mW, Min Operating Temperature=-55°C, Power Rating=62.5mW, Resistor Type="Thick Film", Supplier Part Number 1=603-RC0402FR-070RL, Temperature Coefficient=200ppm/°C, Tolerance=1%, Voltage Rating=50V, Case/Package=0402, ComponentLink1Description=https://datasheet.ciiva.com/8896/pyu-rc0402-51-rohs-l-6-8896149.pdf?src-supplier=Avnet, ComponentLink1URL=https://datasheet.ciiva.com/8896/pyu-rc0402-51-rohs-l-6-8896149.pdf?src-supplier=Avnet, ComponentLink2Description=https://datasheet.ciiva.com/16790/pyu-rc0402-51-rohs-l-6-r-16790444.pdf?src-supplier=Future+Electronics, ComponentLink2URL=https://datasheet.ciiva.com/16790/pyu-rc0402-51-rohs-l-6-r-16790444.pdf?src-supplier=Future+Electronics, Contact Plating=Tin,Matte, Features="Moisture Resistant", Height=0.35mm, Item Type=Resistors, Lead Free="Lead Free", Length=1mm, Manufacturer Part Number=RC0402FR-070RL, Mount="Surface Mount", Number of Terminations=2, Packaging="Tape and Reel", Pricing 1="1=0.10000, 10=0.01400, 50=0.01400, 100=0.00600, 1000=0.00300, 5000=0.00200, 10000=0.00100 (USD)", Radiation Hardening=No, Resistance=0R, RoHS=Yes, RoHS Compliant=Yes, Series=RC, Size Code=0402, Stock 1=8556842, Supplier 1=Mouser, Termination=SMD/SMT, Width=0.5mm
R13: library part RC0402FR-071K2L, "RES 1.2K OHM 1% 1/16W 0402", Case Code (Imperial)=0402, Case Code (Metric)=1005, LCSC Part Number=C138040, Manufacturer=Yageo, Max Operating Temperature=155°C, Max Power Dissipation=63mW, Min Operating Temperature=-55°C, Package Quantity=1, Resistance=1.2kR, Resistance Tolerance=1%, Resistor Type="Thick Film", Temperature Coefficient=100ppm/°C, Voltage Rating=50V, Case/Package=0402, Category="Chip SMD Resistors", ComponentLink1Description=https://datasheet.ciiva.com/11808/0900766b80c66297-11808455.pdf?src-supplier=RSComponents, ComponentLink1URL=https://datasheet.ciiva.com/11808/0900766b80c66297-11808455.pdf?src-supplier=RSComponents, ComponentLink2Description=https://datasheet.ciiva.com/2453/pyu-r-int-thick-7-2453467.pdf?src-supplier=Digi-Key, ComponentLink2URL=https://datasheet.ciiva.com/2453/pyu-r-int-thick-7-2453467.pdf?src-supplier=Digi-Key, ComponentLink3Description=https://datasheet.ciiva.com/2453/pyu-r-int-thick-7-2453468.pdf?src-supplier=Digi-Key, ComponentLink3URL=https://datasheet.ciiva.com/2453/pyu-r-int-thick-7-2453468.pdf?src-supplier=Digi-Key, ComponentLink4Description=https://datasheet.ciiva.com/2453/pyu-r-int-thick-7-2453466.pdf?src-supplier=Digi-Key, ComponentLink4URL=https://datasheet.ciiva.com/2453/pyu-r-int-thick-7-2453466.pdf?src-supplier=Digi-Key, ComponentLink5Description=https://datasheet.ciiva.com/7849/1018594-7849861.pdf?src-supplier=Element14, ComponentLink5URL=https://datasheet.ciiva.com/7849/1018594-7849861.pdf?src-supplier=Element14, ComponentLink6Description=https://datasheet.ciiva.com/7849/1018594-7849862.pdf?src-supplier=Element14, ComponentLink6URL=https://datasheet.ciiva.com/7849/1018594-7849862.pdf?src-supplier=Element14, ComponentLink7Description=https://datasheet.ciiva.com/15189/getdatasheetpartid-323716-15189366.pdf?src-supplier=Verical, ComponentLink7URL=https://datasheet.ciiva.com/15189/getdatasheetpartid-323716-15189366.pdf?src-supplier=Verical, ComponentLink8Description=https://datasheet.ciiva.com/16745/pyu-rc0402-51-rohs-l-6-r-16745005.pdf?src-supplier=Future+Electronics, ComponentLink8URL=https://datasheet.ciiva.com/16745/pyu-rc0402-51-rohs-l-6-r-16745005.pdf?src-supplier=Future+Electronics, Construction=Rectangular, Depth=0.5mm, Features="Moisture Resistant", Height=0.016inch, Item Type=Resistor, Lead Free="Lead Free", Length=0.039inch, Manufacturer Part Number=RC0402FR-071K2L, Military Standard=Not, Number of Terminations=2, Packaging="Tape and Reel", Power Rating=63mW, Pricing 1="10000=0.00085 (USD)", RoHS=Yes, RoHS Compliant=Yes, Series=RC, Size Code=0402, Stock 1=170000, Supplier 1=Avnet, Supplier Part Number 1=RC0402FR-071K2L, Technology="THICK FILM", Termination=SMD/SMT, Tolerance=1%, Width=0.02inch
R14 R15: library part RC0402FR-074K7L, "RES 4.7K OHM 1% 1/16W 0402", Case Code (Imperial)=0402, Case Code (Metric)=1005, LCSC Part Number=C105871, Manufacturer=Yageo, Max Operating Temperature=155°C, Max Power Dissipation=63mW, Min Operating Temperature=-55°C, Power Rating=62.5mW, Resistance=4.7kR, Resistance Tolerance=1%, Resistor Type="Thick Film", Temperature Coefficient=100ppm/°C, Voltage Rating=50V, Case/Package=0402, Category="Chip SMD Resistors", ComponentLink1Description=https://datasheet.ciiva.com/22661/1686128-22661342.pdf?src-supplier=Element14, ComponentLink1URL=https://datasheet.ciiva.com/22661/1686128-22661342.pdf?src-supplier=Element14, ComponentLink2Description=https://datasheet.ciiva.com/7850/1018594-7850022.pdf?src-supplier=Element14, ComponentLink2URL=https://datasheet.ciiva.com/7850/1018594-7850022.pdf?src-supplier=Element14, ComponentLink3Description=https://datasheet.ciiva.com/7850/1018594-7850023.pdf?src-supplier=Element14, ComponentLink3URL=https://datasheet.ciiva.com/7850/1018594-7850023.pdf?src-supplier=Element14, ComponentLink4Description=https://datasheet.ciiva.com/15215/getdatasheetpartid-328119-15215035.pdf?src-supplier=Verical, ComponentLink4URL=https://datasheet.ciiva.com/15215/getdatasheetpartid-328119-15215035.pdf?src-supplier=Verical, Construction=Rectangular, Depth=0.5mm, Features="Moisture Resistant", Height=0.32mm, Height - Seated (Max)=0.016inch, Item Type=Resistor, Lead Free="Lead Free", Length=1mm, Manufacturer Part Number=RC0402FR-074K7L, Military Standard=Not, Number of Pins=2, Number of Terminations=2, Packaging="Tape and Reel", Pricing 1="10000=0.00085 (USD)", Reach SVHC Compliant=Yes, RoHS=Yes, RoHS Compliant=Yes, Series=RC, Size Code=0402, Stock 1=2420000, Supplier 1=Avnet, Supplier Part Number 1=RC0402FR-074K7L, Termination=SMD/SMT, Tolerance=1%, Voltage Rating (DC)=50V, Width=0.5mm
R18: library part RK73H1ETTP3300F, "RES 330 OHM 1% 1/10W 0402", Case Code (Imperial)=0402, Case Code (Metric)=1005, LCSC Part Number=C159971, Manufacturer="KOA Speer", Max Operating Temperature=155°C, Max Power Dissipation=100mW, Min Operating Temperature=-55°C, Package Quantity=10000, Power Rating=63mW, Ratings=AEC-Q200, Supplier Part Number=6317972, Temperature Coefficient=100ppm/°C, Tolerance=1%, Voltage Rating=50V, Case/Package=0402, Category="Chip SMD Resistors", ComponentLink1Description=https://datasheet.ciiva.com/5555/rk73h-5555909.pdf?src-supplier=Mouser, ComponentLink1URL=https://datasheet.ciiva.com/5555/rk73h-5555909.pdf?src-supplier=Mouser, ComponentLink2Description=https://datasheet.ciiva.com/15203/getdatasheetpartid-424481-15203100.pdf?src-supplier=Verical, ComponentLink2URL=https://datasheet.ciiva.com/15203/getdatasheetpartid-424481-15203100.pdf?src-supplier=Verical, Construction=Rectangular, Features="Moisture Resistant,Automotive AEC-Q200", Height=0.35mm, Lead Free="Lead Free", Length=1mm, Manufacturer Part Number=RK73H1ETTP3300F, Military Standard=Not, Number of Terminations=2, Packaging="Tape and Reel", Pricing="100=0.007, 1000=0.006, 2500=0.006, 5000=0.006, 10000=0.005 (GBP)", RoHS=Yes, RoHS Compliant=Yes, Series=RK73H, Stock=36500, Supplier=Rs, Termination=SMD/SMT, Voltage Rating (DC)=50V, Width=0.5mm
R20: library part RC0402FR-0711KL, "RES 11K OHM 1% 1/16W 0402", Case Code (Imperial)=0402, Case Code (Metric)=1005, LCSC Part Number=C138063, Manufacturer=Yageo, Max Operating Temperature=155°C, Max Power Dissipation=63mW, Min Operating Temperature=-55°C, Package Quantity=1, Resistance Tolerance=1%, Resistor Type="Thick Film", Temperature Coefficient=100ppm/°C, Voltage Rating=50V, Case/Package=0402, ComponentLink1Description=https://datasheet.ciiva.com/5999/1018594-5999918.pdf?src-supplier=Farnell, ComponentLink1URL=https://datasheet.ciiva.com/5999/1018594-5999918.pdf?src-supplier=Farnell, ComponentLink2Description=https://datasheet.ciiva.com/2453/pyu-r-int-thick-7-2453641.pdf?src-supplier=Digikey, ComponentLink2URL=https://datasheet.ciiva.com/2453/pyu-r-int-thick-7-2453641.pdf?src-supplier=Digikey, ComponentLink3Description=https://datasheet.ciiva.com/2453/pyu-r-int-thick-7-2453642.pdf?src-supplier=Digikey, ComponentLink3URL=https://datasheet.ciiva.com/2453/pyu-r-int-thick-7-2453642.pdf?src-supplier=Digikey, ComponentLink4Description=https://datasheet.ciiva.com/2453/pyu-r-int-thick-7-2453640.pdf?src-supplier=Digikey, ComponentLink4URL=https://datasheet.ciiva.com/2453/pyu-r-int-thick-7-2453640.pdf?src-supplier=Digikey, ComponentLink5Description=https://datasheet.ciiva.com/12668/pyu-rc0402-51-rohs-l-6-r-12668234.pdf?src-supplier=Mouser, ComponentLink5URL=https://datasheet.ciiva.com/12668/pyu-rc0402-51-rohs-l-6-r-12668234.pdf?src-supplier=Mouser, Features="Moisture Resistant", Height=0.016inch, Item Type=Resistors, Lead Free="Lead Free", Length=0.039inch, Manufacturer Part Number=RC0402FR-0711KL, Number of Terminations=2, Packaging="Tape and Reel", Pins=2, Power Rating=63mW, Pricing="10000=0.0018, 100000=0.0011, 150000=0.0017, 300000=0.001, 500000=0.0016, 750000=0.001, 1500000=0.0015, 2000000=0.0009, 5000000=0.0014 (USD)", Reach SVHC Compliant=No, RoHS=Yes, RoHS Compliant=Yes, Series=RC, Stock=350000, Supplier="Future Electronics", Termination=SMD/SMT, Tolerance=1%, Voltage Rating (DC)=50V, Width=0.02inch
R21: library part AC0402JR-0716RL, "RES SMD 16 OHM 5% 1/16W 0402", Case/Package=0402, LCSC Part Number=C227309, Manufacturer=Yageo, Max Operating Temperature=155°C, Max Power Dissipation=63mW, Min Operating Temperature=-55°C, Supplier Part Number=AC0402JR-0716RL-ND, Temperature Coefficient=100ppm/°C, Tolerance=5%, Voltage Rating=50V, Category="Chip SMD Resistors", ComponentLink1Description=http://www.yageo.com/NewPortal/yageodocoutput?fileName=/pdf/R-Chip/PYu-AC_51_RoHS_L_6.pdf&src-supplier=Digikey, ComponentLink1URL=http://www.yageo.com/NewPortal/yageodocoutput?fileName=/pdf/R-Chip/PYu-AC_51_RoHS_L_6.pdf&src-supplier=Digikey, Features="Moisture Resistant,Automotive AEC-Q200", Height=0.015inch, Item Type=Resistor, Length=0.039inch, Manufacturer Part Number=AC0402JR-0716RL, Number of Terminations=2, Packaging="Tape and Reel", Pricing="10000=0.00299 (USD)", RoHS=Yes, RoHS Compliant=Yes, Series=AC, Supplier=Digikey, Width=0.02inch
R24: library part ERJ-2RKF2700X, "RES SMD 270 OHM 1% 1/10W 0402", LCSC Part Number=C278588, Manufacturer=Panasonic, Voltage Rating (DC)=50V, ComponentLink1Description=https://datasheet.ciiva.com/11821/0900766b80f80784-11821240.pdf?src-supplier=Rs, ComponentLink1URL=https://datasheet.ciiva.com/11821/0900766b80f80784-11821240.pdf?src-supplier=Rs, ComponentLink2Description=https://datasheet.ciiva.com/46373/1678782-46373915.pdf?src-supplier=Element14, ComponentLink2URL=https://datasheet.ciiva.com/46373/1678782-46373915.pdf?src-supplier=Element14, ComponentLink3Description=https://datasheet.ciiva.com/46373/1678782-46373916.pdf?src-supplier=Element14, ComponentLink3URL=https://datasheet.ciiva.com/46373/1678782-46373916.pdf?src-supplier=Element14, ComponentLink4Description=https://datasheet.ciiva.com/16767/70260748-16767359.pdf?src-supplier=Allied+Electronics, ComponentLink4URL=https://datasheet.ciiva.com/16767/70260748-16767359.pdf?src-supplier=Allied+Electronics, ComponentLink5Description=https://datasheet.ciiva.com/7944/aoa0000ce2-7944940.pdf?src-supplier=Element14, ComponentLink5URL=https://datasheet.ciiva.com/7944/aoa0000ce2-7944940.pdf?src-supplier=Element14, ComponentLink6Description=https://datasheet.ciiva.com/22705/1678782-22705421.pdf?src-supplier=Element14, ComponentLink6URL=https://datasheet.ciiva.com/22705/1678782-22705421.pdf?src-supplier=Element14, ComponentLink7Description=https://datasheet.ciiva.com/7944/aoa0000ce2-7944606.pdf?src-supplier=Element14, ComponentLink7URL=https://datasheet.ciiva.com/7944/aoa0000ce2-7944606.pdf?src-supplier=Element14, ComponentLink8Description=https://datasheet.ciiva.com/24069/aoa0000ce2-24069133.pdf?src-supplier=Mouser, ComponentLink8URL=https://datasheet.ciiva.com/24069/aoa0000ce2-24069133.pdf?src-supplier=Mouser, ComponentLink9Description=https://datasheet.ciiva.com/9183/aoa0000ce2-9183598.pdf?src-supplier=Avnet, ComponentLink9URL=https://datasheet.ciiva.com/9183/aoa0000ce2-9183598.pdf?src-supplier=Avnet, ComponentLink10Description=https://datasheet.ciiva.com/43467/1678782-43467257.pdf?src-supplier=Farnell, ComponentLink10URL=https://datasheet.ciiva.com/43467/1678782-43467257.pdf?src-supplier=Farnell, ComponentLink11Description=https://datasheet.ciiva.com/5860/aoa0000ce2-5860650.pdf?src-supplier=Farnell, ComponentLink11URL=https://datasheet.ciiva.com/5860/aoa0000ce2-5860650.pdf?src-supplier=Farnell, ComponentLink12Description=https://datasheet.ciiva.com/9183/aoa0000ce2-9183566.pdf?src-supplier=Avnet, ComponentLink12URL=https://datasheet.ciiva.com/9183/aoa0000ce2-9183566.pdf?src-supplier=Avnet, ComponentLink13Description=https://datasheet.ciiva.com/16766/70260748-16766103.pdf?src-supplier=Allied+Electronics, ComponentLink13URL=https://datasheet.ciiva.com/16766/70260748-16766103.pdf?src-supplier=Allied+Electronics, ComponentLink14Description=https://datasheet.ciiva.com/30198/aoa0000ce2-30198389.pdf?src-supplier=Onlinecomponents.com, ComponentLink14URL=https://datasheet.ciiva.com/30198/aoa0000ce2-30198389.pdf?src-supplier=Onlinecomponents.com, Item Type=Resistors, Lead Free=5697LeadFree, Manufacturer Part Number=ERJ-2RKF2700X, Pricing="1=0.1, 10=0.015, 50=0.015, 100=0.009, 1000=0.008, 10000=0.004 (USD)", RoHS=Yes, Stock=141131, Supplier=Mouser
R25: library part CRCW040210R0FKEDHP, "RES SMD 10 OHM 1% 1/5W 0402", Case Code (Imperial)=0402, Case Code (Metric)=1005, LCSC Part Number=C4013850, Manufacturer="Vishay Dale", Max Operating Temperature=155°C, Max Power Dissipation=200mW, Min Operating Temperature=-55°C, Package Quantity=10000, Power Rating=125mW, Resistance Tolerance=1%, Resistor Type="Thick Film", Supplier Part Number 1=541-10.0YCT-ND, Temperature Coefficient=100ppm/°C, Voltage Rating=50V, Case/Package=0402, ComponentLink1Description=http://www.mouser.com/ds/2/427/crcwhpe3-46056.pdf?src-supplier=Mouser, ComponentLink1URL=http://www.mouser.com/ds/2/427/crcwhpe3-46056.pdf?src-supplier=Mouser, Construction=Rectangular, Contact Plating=Tin, Depth=0.5mm, Features="Automotive AEC-Q200", Height=0.3mm, Lead Free="Lead Free", Length=1mm, Manufacturer Part Number=CRCW040210R0FKEDHP, Military Standard=Not, Mount="Surface Mount", Number of Terminations=2, Packaging="Tape and Reel", Pricing 1="1=0.15, 10=0.132, 100=0.0506, 1000=0.02226, 2500=0.01923, 5000=0.0172 (USD)", Radiation Hardening=No, REACH SVHC=Unknown, Resistance=10R, RoHS Compliant=Yes, Series=CRCW-HP, Stock 1=28500, Supplier 1=Digi-Key, Technology="THICK FILM", Termination=SMD/SMT, Tolerance=1%, Voltage Rating (DC)=50V, Weight=2.3E-05oz, Width=0.5mm
R26: library part RC0603JR-070RL, "RES 0 OHM JUMPER 1/10W 0603", Case Code (Imperial)=0603, Case Code (Metric)=1608, LCSC Part Number=C95177, Manufacturer=Yageo, Max Operating Temperature=155°C, Max Power Dissipation=100mW, Min Operating Temperature=-55°C, Package Quantity=5000, Resistance=0mR, Resistance Tolerance=5%, Resistor Type="Thick Film", Supplier Part Number 1=311-0.0GRCT-ND, Temperature Coefficient=200ppm/°C, Tolerance=1%, Voltage Rating=50V, Case/Package=0603, Category="Chip SMD Resistors", Construction=Rectangular, Contact Plating=Tin,Matte, Depth=0.8mm, Features="Moisture Resistant", Height=0.45mm, Item Type=Resistor, Lead Free="Lead Free", Length=1.6mm, Manufacturer Part Number=RC0603JR-070RL, Military Standard=Not, Number of Pins=2, Number of Terminations=2, Packaging="Tape and Reel", Power Rating=100mW, Pricing 1="1=0.10000, 10=0.01700, 25=0.01240, 50=0.00960, 100=0.00700, 250=0.00536, 500=0.00430, 1000=0.00316 (USD)", Radiation Hardening=No, Reach SVHC Compliant="No SVHC", RoHS=Yes, RoHS Compliant=Yes, Series=RC, Size Code=0603, Stock 1=18081776, Supplier 1=Digi-Key, Technology="THICK FILM", Termination=SMD/SMT, Voltage Rating (DC)=50V, Width=0.8mm